# Altium PCB OFP_VIM_v1.5.2.PcbDoc (part 1 of 3)
Units mil, origin at the board's own origin, x right, y up, seen from the top; angles counter-clockwise.
Board outline 4311.02 x 2539.37 mil, 2 copper layers (Top Layer, Bottom Layer), stack 62.256 mil thick; 96 components, 59 nets, 240 pads, 33 vias.
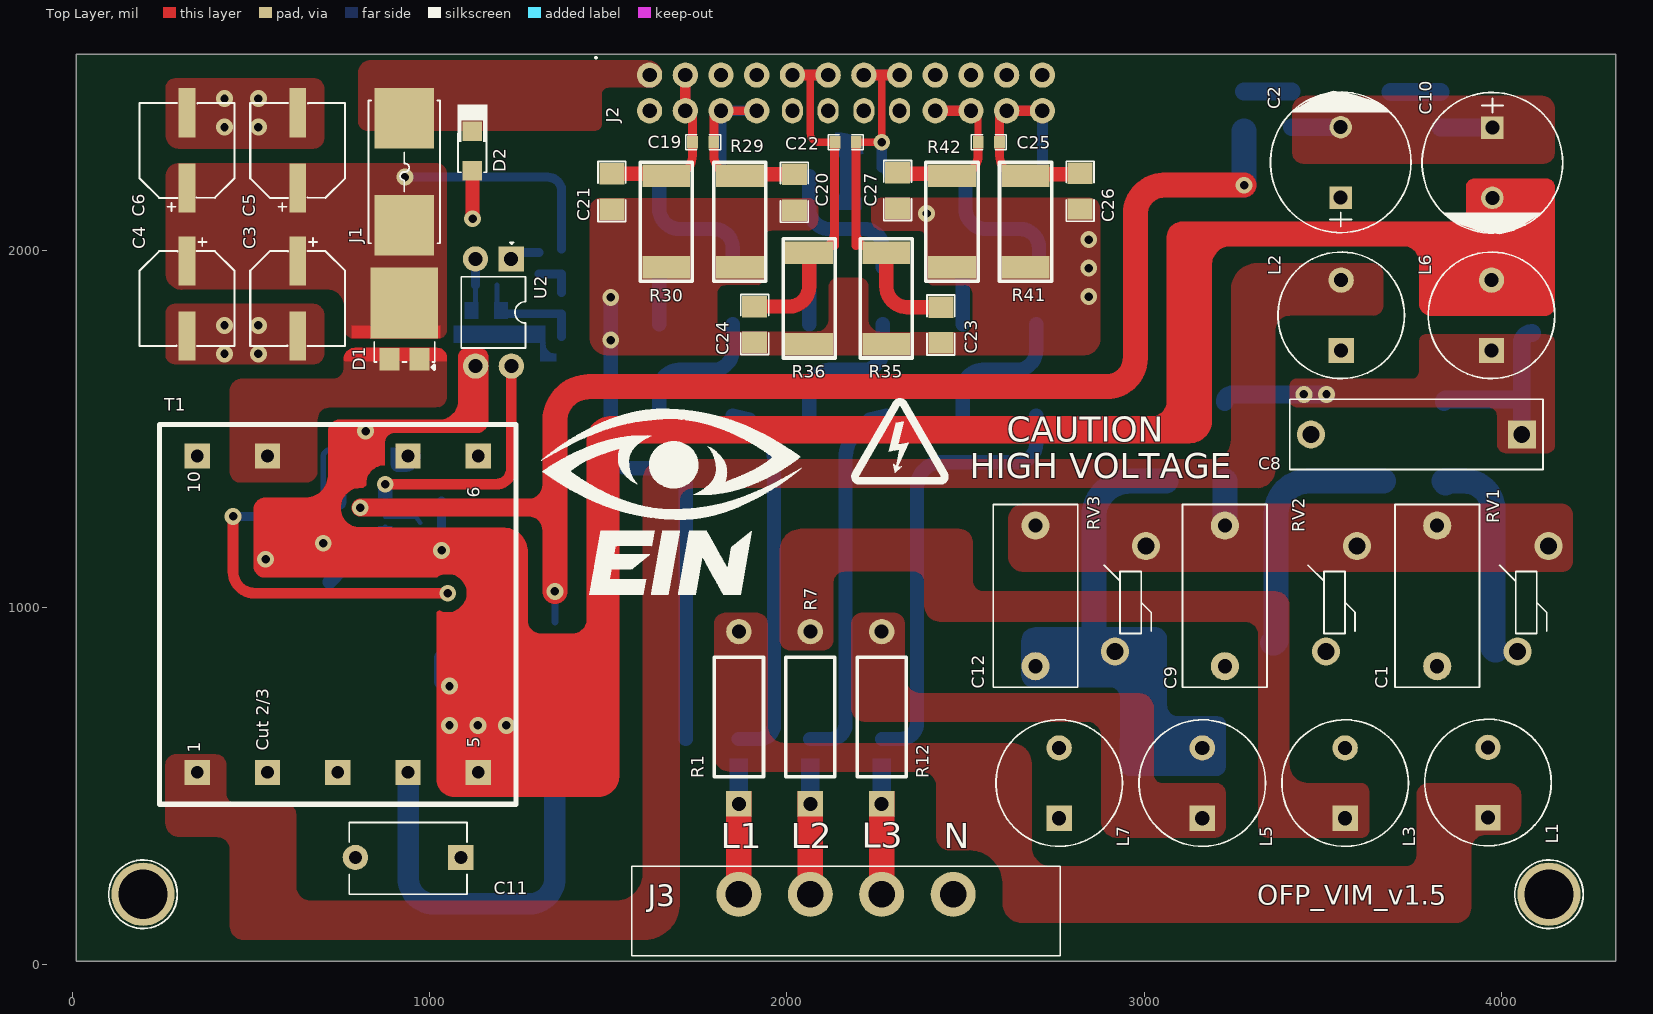
[diagram p0: Top Layer view]
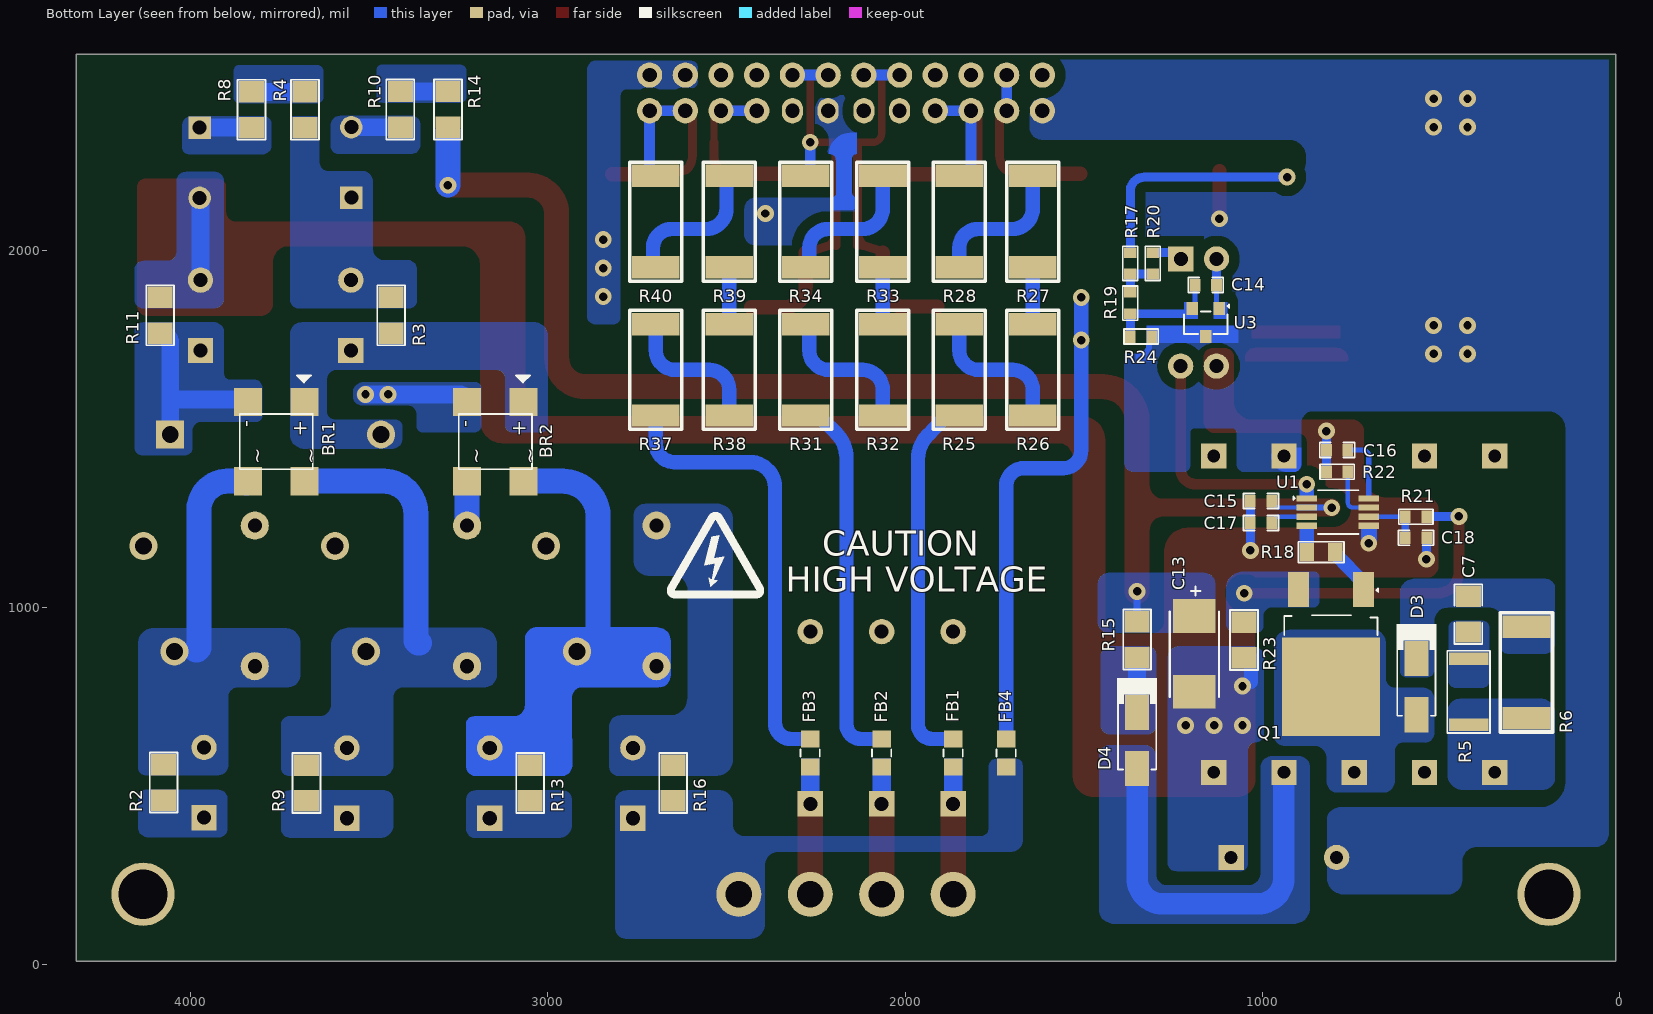
[diagram p1: Bottom Layer view, seen from below]
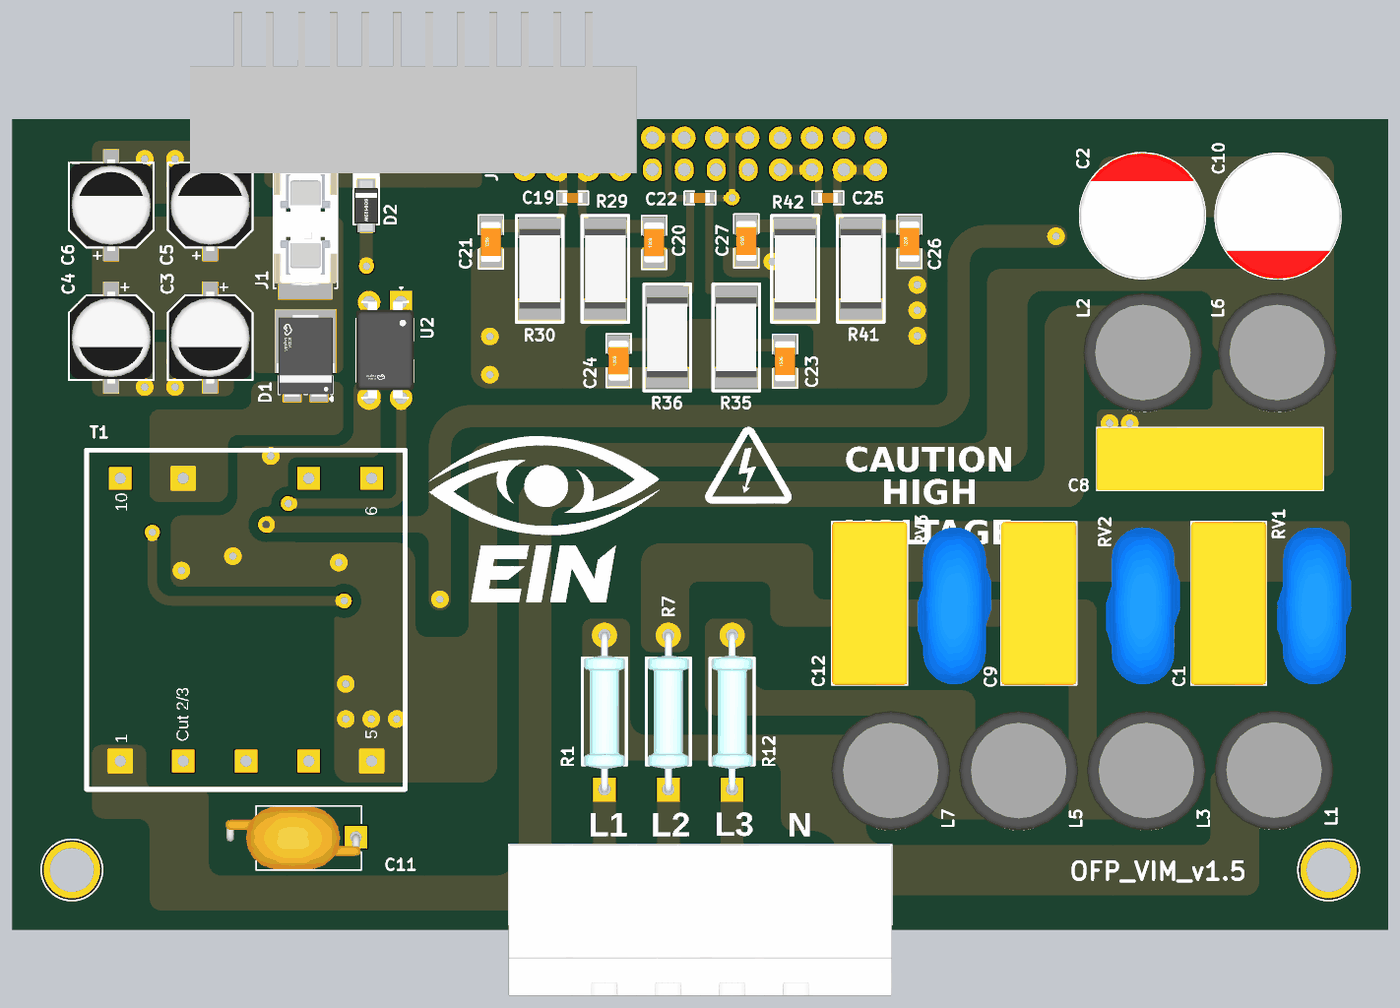
[diagram p3: 3D render of the assembled board from above, using the file's embedded part models]
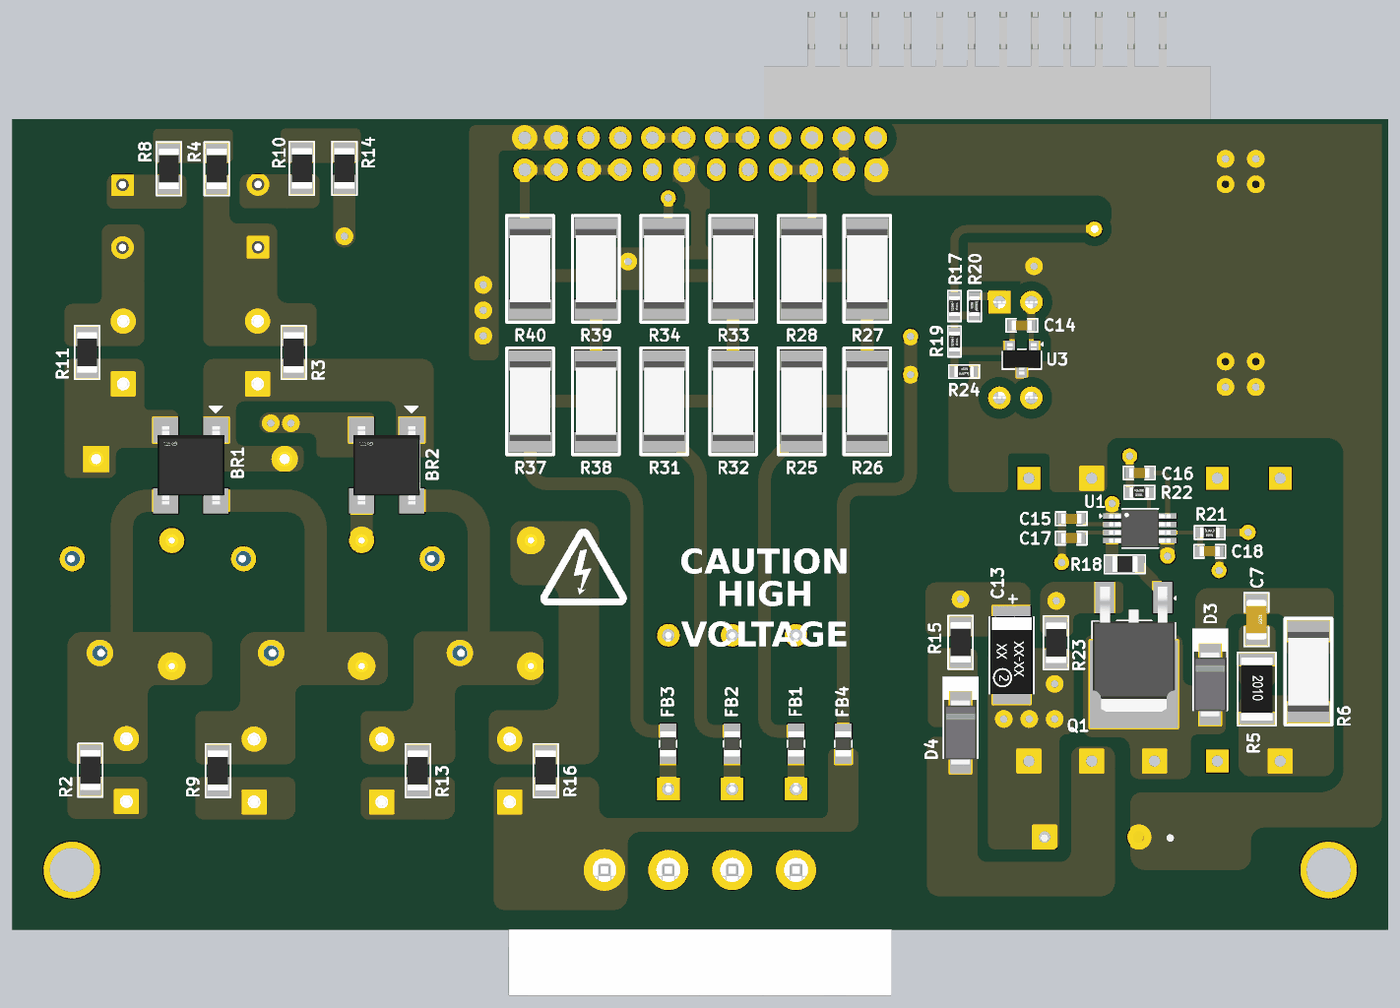
[diagram p4: 3D render of the assembled board from below, using the file's embedded part models]

## Layer stack, top to bottom
Top Solder: solder mask 0.4, Solder Resist, Dk 3.5
Top Layer: signal copper 1.378
Dielectric 1: dielectric 59.5, FR-4, Dk 4.8
Bottom Layer: signal copper 1.378
Bottom Solder: solder mask 0.4, Solder Resist, Dk 3.5

## Board outline
9.84,9.84 9.84,2549.21 4320.87,2549.21 4320.87,9.84

## Design rules (kind name [scope] priority, off if disabled: settings)
BoardOutlineClearance [All] p1: gap=0 ignorepadtopadclearanceinfootprint=FALSE except(15: Poly-OutlineEdge)
Clearance [All] p1: gap=10 ignorepadtopadclearanceinfootprint=FALSE except(7: SMDPad-SMDPad SMDPad-Fill; 20: Arc-Region Track-Region SMDPad-Region THPad-Region Via-Region Fill-Region Poly-Region Region-Region; 30: Arc-Poly Track-Poly SMDPad-Poly THPad-Poly Via-Poly Fill-Poly Poly-Poly)
ComponentClearance [All] p1: gap=0 collisioncheckmode=3 verticalgap=0 showdistances=FALSE
HoleSize [All] p1: absolutevalues=TRUE maxlimit=1000 minlimit=1 maxpercent=80.000 minpercent=20.000
HoleToHoleClearance [All] p1: gap=0 allowstackedmicrovias=TRUE
MinimumSolderMaskSliver [All] p1: minsoldermaskwidth=0
PolygonConnect [All] p1: connectstyle=Direct reliefconductorwidth=10 reliefentries=4 polygonreliefangle="90 Angle" airgapwidth=10
RoutingVias [All] p1: holewidth=11.81 width=23.62 viastyle="Through Hole" minholewidth=23.62 minwidth=47.24 maxholewidth=23.62 maxwidth=47.24
SilkToSilkClearance [All] p1: silktosilkclearance=0
SilkToSolderMaskClearance [IsPad] p1: minsilkscreentomaskgap=0 clearancetoexposedcopper=TRUE
SolderMaskExpansion [All] p1: expansion=4 istentingtop=FALSE
SupplyNets "Schematic Supply Nets_44" [InNet('VIN+')] p1: voltage=0.000
SupplyNets "Schematic Supply Nets_43" [InNet('GND')] p2: voltage=0.000
SupplyNets "Schematic Supply Nets_42" [InNet('12V')] p3: voltage=0.000
SupplyNets "Schematic Supply Nets_41" [InNet('PGND')] p4: voltage=0.000
SupplyNets "Schematic Supply Nets_33" [InNet('VA_P')] p5: voltage=0.000
SupplyNets "Schematic Supply Nets_29" [InNet('VB_P')] p6: voltage=0.000
SupplyNets "Schematic Supply Nets_24" [InNet('VB_N')] p7: voltage=0.000
SupplyNets "Schematic Supply Nets_23" [InNet('VC_N')] p8: voltage=0.000
SupplyNets "Schematic Supply Nets_19" [InNet('VC_P')] p9: voltage=0.000
SupplyNets "Schematic Supply Nets_7" [InNet('VA_N')] p10: voltage=0.000
SupplyNets "Schematic Supply Nets_4" [InNet('NGND')] p11: voltage=0.000
Width [All] p1: maxlimit=100 minlimit=8 preferedwidth=15 minimp=50.000000 maximp=50.000000 favimp=50.000000
24 further rules are at their usual default settings.

## Classes and differential pairs
component class Power-Supply-Sheet: BR1 BR2 C1 C2 C3 C4 C5 C6 C7 C8 C9 C10 C11 C12 C13 C14 C15 C16 C17 C18 D1 D2 D3 D4 F1 J1 L1 L2 L3 L5 L6 L7 Q1 R1 R2 R3 R4 R6 R7 R8 R9 R10 R11 R12 R13 R14 R15 R16 R17 R18 R19 R20 R21 R22 R23 R24 RV1 RV2 RV3 T1 U1 U2 U3
component class INPUT-Connectors-Sheet: C19 C20 C21 C22 C23 C24 C25 C26 C27 FB1 FB2 FB3 FB4 J2 J3 R25 R26 R27 R28 R29 R30 R31 R32 R33 R34 R35 R36 R37 R38 R39 R40 R41 R42

## Components (designator, comment, footprint, x,y, rotation, side; value= is the part's Value field where it differs from the comment)
BR1 "LMB8S-TP" LMBS-1 3760.83,1464.41 r270 bottom
BR2 "LMB8S-TP" LMBS-1 3147.39,1464.41 r270 bottom
C1 "0.1uF" B32921C3104M000 3820.83,1032.34 r270 top locked value=100nF
C2 "33uF" 87EC0494 3550.66,2246.42 r90 top
C3 "68uF" EEEFK1E680P 630,1865 r270 top
C4 "68uF" EEEFK1E680P 320,1865 r270 top
C5 "68uF" EEEFK1E680P 630,2280 r90 top
C6 "68uF" EEEFK1E680P 320,2280 r90 top
C7 "1nF" Cap-1206 422.76,981.35 r270 bottom
C8 "10nF" KP103J1000VP15 3762.5,1484.41 r180 top
C9 "0.1uF" B32921C3104M000 3226.13,1032.34 r270 top locked value=100nF
C10 "33uF" 87EC0494 3975.34,2245.42 r270 top
C11 "1nF" VY2102M29Y5US6TV7 939.07,300 r180 top
C12 "0.1uF" B32921C3104M000 2695.95,1032.34 r270 top locked value=100nF
C13 "10uF" Case-C 1190,870 r270 bottom
C14 "0.01uF" Cap-0603 1158,1902.97 r180 bottom
C15 "1uF" Cap-0603 1003,1297.8 r180 bottom
C16 "220nF" Cap-0603 790,1440.94 r180 bottom
C17 "1uF" Cap-0603 1003.01,1236.61 r180 bottom
C18 "220pF" Cap-0603 569.35,1195 r0 bottom
C19 "51pF" Cap-0603 1765.35,2302.65 r180 top
C20 "22nF" Cap-1206 2020.86,2162.88 r90 top
C21 "22nF" Cap-1206 1509.77,2164.78 r90 top
C22 "51pF" Cap-0603 2164.36,2302.64 r180 top
C23 "22nF" Cap-1206 2430.83,1790.85 r90 top
C24 "22nF" Cap-1206 1909.8,1792.69 r90 top
C25 "51pF" Cap-0603 2565.35,2302.65 r180 top
C26 "22nF" Cap-1206 2820.86,2165.83 r90 top
C27 "22nF" Cap-1206 2309.8,2167.7 r90 top
D1 "FSV20150V" TO-277A 929,1774 r270 top
D2 "15V" SOD-123W 1119,2278 r90 top
D3 "US1K-13-F" SMA 568,778.23 r270 bottom
D4 "ES1C-13-F" SMA 1350,627.74 r270 bottom value=10pF
FB1 "BLM21BD152SN1D" Ind-0805 1865.35,592.37 r90 bottom
FB2 "BLM21BD152SN1D" Ind-0805 2065.35,592.37 r90 bottom
FB3 "BLM21BD152SN1D" Ind-0805 2266,592.37 r90 bottom
FB4 "BLM21BD152SN1D" Ind-0805 1717,592.37 r90 bottom
J1 "01550900M" 01550900M 928.4,2219.76 r90 top
J2 "SFH11-PBPC-D12-RA-BK" SFH11-PBPC-D12-RA-BK 2165.35,2440.95 r180 top locked
J3 "DB2ERM-5.08-4P-GN" DB2ERM-5.08-4P-GN 2165.35,196.85 r0 top locked
L1 "470uH" PK0810-471MB 3963,509.86 r90 top
L2 "470uH" PK0810-471MB 3552,1818.14 r90 top
L3 "470uH" PK0810-471MB 3563,508.29 r90 top locked
L5 "470uH" PK0810-471MB 3163,508.29 r90 top locked
L6 "470uH" PK0810-471MB 3973,1818.14 r90 top
L7 "470uH" PK0810-471MB 2762.35,508.29 r90 top locked
Q1 "IPD90R1K2C3" TO-252-2L 807.19,914.33 r0 bottom
R1 "1R" FMP200JR-52-1R 1865.35,691.14 r90 top
R2 "10K" Res-1206 4076,509.86 r90 bottom value=10kR
R3 "10K" Res-1206 3439,1818.14 r90 bottom value=10kR
R4 "976K" Res-1206 3680.09,2393.85 r270 bottom value=976kR
R5 "100R" RES-2010 421.71,763.78 r270 bottom
R6 "47K" RES-2512 260,818.07 r270 bottom value=47kR
R7 "1R" FMP200JR-52-1R 2065.35,691.14 r90 top
R8 "976K" Res-1206 3830,2393.85 r90 bottom value=976kR
R9 "10K" Res-1206 3676,508.28 r90 bottom value=10kR
R10 "976K" Res-1206 3413.49,2394.85 r270 bottom value=976kR
R11 "10K" Res-1206 4086,1818.14 r90 bottom value=10kR
R12 "1R" FMP200JR-52-1R 2265.35,691.14 r90 top
R13 "10K" Res-1206 3050,508.28 r90 bottom value=10kR
R14 "976K" Res-1206 3280,2394.85 r90 bottom value=976kR
R15 "10R" Res-1206 1350,910 r270 bottom
R16 "10K" Res-1206 2649.35,508.28 r90 bottom value=10kR
R17 "49.9R" Res-0603 1369.13,1963.69 r90 bottom
R18 "0R" Res-0805 835,1155 r180 bottom
R19 "100K" Res-0603 1369.13,1852.61 r90 bottom value=100kR
R20 "4.99K" Res-0603 1306.13,1963.7 r270 bottom value=4.99kR
R21 "1K" Res-0603 569.35,1254.2 r180 bottom
R22 "66.5K" Res-0603 790,1380 r180 bottom
R23 "750mR" Res-1206 1051,909.06 r90 bottom
R24 "26.1K" Res-0603 1339.13,1758.54 r0 bottom
R25 "200K" RES-2512 1848.16,1665.54 r90 bottom
R26 "200K" RES-2512 1642.16,1665.54 r90 bottom
R27 "200K" RES-2512 1642.16,2080.54 r90 bottom
R28 "200K" RES-2512 1848.16,2080.54 r90 bottom
R29 "1K" RES-2512 1868.16,2080.54 r90 top value=1kR
R30 "1K" RES-2512 1662.16,2080.54 r90 top value=1kR
R31 "200K" RES-2512 2278.16,1665.54 r90 bottom
R32 "200K" RES-2512 2062.16,1665.54 r90 bottom
R33 "200K" RES-2512 2062.16,2080.54 r90 bottom
R34 "200K" RES-2512 2278.16,2080.54 r90 bottom
R35 "1K" RES-2512 2278.16,1865.54 r90 top value=1kR
R36 "1K" RES-2512 2062.16,1865.53 r90 top value=1kR
R37 "200K" RES-2512 2698.16,1665.54 r90 bottom
R38 "200K" RES-2512 2492.16,1665.54 r90 bottom
R39 "200K" RES-2512 2492.16,2080.54 r90 bottom
R40 "200K" RES-2512 2698.16,2080.54 r90 bottom
R41 "1K" RES-2512 2668.16,2080.54 r90 top value=1kR
R42 "1K" RES-2512 2462.16,2080.55 r90 top value=1kR
RV1 "471KD10J" 471KD10J 4089.33,1024.44 r270 top locked
RV2 "471KD10J" 471KD10J 3552.73,1024.44 r270 top locked
RV3 "471KD10J" 471KD10J 2961.72,1024.44 r270 top locked
T1 "FTEFD25-037" FTEFD25-037 742.22,981.09 r90 top locked
U1 "LM5021MM-1/NOPB" "8-VSSOP (Pitch 0.65mm)(5x3.1mm)" 788,1267 r180 bottom
U2 "FOD817A" DIP-4 1178,1826 r270 top
U3 "ATL431AIDBZR" SOT-23 1158,1797.91 r0 bottom

## Footprints (in the part's own frame and the unit in brackets; to place one, negate y for a bottom-side part, rotate by r counter-clockwise, add the part's x,y. Pads: shape width x height; smd on the part's side, far side on the other; paste and mask are expansions set on the pad)
"8-VSSOP (Pitch 0.65mm)(5x3.1mm)" [mm]
  rect 1.45x0.45 smd mask+0.05: 1(-2.2,0.975) 2(-2.2,0.325) 3(-2.2,-0.325) 4(-2.2,-0.975) 5(2.2,-0.975) 6(2.2,-0.325) 7(2.2,0.325) 8(2.2,0.975)
  silkscreen extent -3.17,-1.55 1.47,1.55, body extent -2.45,-1.5 2.45,1.5, height 1.1
87EC0494 [mm]
  rect 1.6x1.6 hole 1: 1(-2.5,0)
  round 1.6 hole 1: 2(2.5,0)
  silkscreen extent -5,-5 5.08,5, body extent -5,-5 5,5, height 13
471KD10J [mm]
  round 2 hole 1.2 paste-2539.97 mask+0.051: 1(-3.749,1.1) 2(3.749,-1.1)
  body extent -6.25,-2.95 6.25,2.95, height 13.75
01550900M [mm]
  rect 4.3x4.24 smd paste+0 mask+0.051: 1(-3.8,0) 2(3.8,0)
  silkscreen extent -5.08,-2.54 5.08,2.54, body extent -4.86,-2.52 4.87,2.52, height 3.81
B32921C3104M000 [mm]
  round 2 hole 1: 1(-5,0) 2(5,0)
  silkscreen extent -6.5,-3 6.5,3, body extent -6.5,-3 6.5,3, height 12
Cap-0603 [mil]
  rect 30x35 smd mask+2.36: 1(-30,0) 2(30,0)
  silkscreen extent -49,-21 49,21, body extent -32,-16 31,16, height 34
Cap-1206 [mil] "SMD 1206"
  rect 60x70 smd: 1(-50,0) 2(50,0)
  silkscreen extent -84,-39 84,39, body extent -63,-31 63,32, height 39
Case-C [mm]
  rect 2.4x3 smd: 1(-2.7,0) 2(2.7,0)
  silkscreen extent -4.8,-1.75 3.05,1.75, body extent -3.1,-1.67 3.1,1.68, height 2.46
DB2ERM-5.08-4P-GN [mm]
  round 3.2 hole 1.9 paste-2539.97 mask+0.051: 1(-7.62,0) 2(-2.54,0) 3(2.54,0) 4(7.62,0)
  silkscreen extent -15.24,-4.37 15.24,2, body extent -15.24,-10 15.24,2, height 8.5
DIP-4 [mm]
  rect 1.8x1.8 hole 1 paste-2539.97 mask+0.051: 1(-3.81,1.265)
  round 1.8 hole 1 copper offset 0,0 paste-2539.97 mask+0.051: 2(-3.81,-1.275) 3(3.81,-1.265) 4(3.81,1.275)
  silkscreen extent -4.98,-2.28 2.53,2.29, body extent -3.91,-2.3 3.91,2.3, height 4.29
EEEFK1E680P [mm]
  rect 3.5x1.2 smd paste+0 mask+0.051: 1(-2.67,0) 2(2.67,0)
  silkscreen extent -4.31,-3.38 3.38,3.38, body extent -3.65,-3.3 3.65,3.3, height 5.8
FMP200JR-52-1R [mm]
  rect 1.8x1.8 hole 1: 1(-6.125,0)
  round 1.8 hole 1: 2(6.125,0)
  silkscreen extent -4.19,-1.75 4.32,1.75, body extent -6.4,-1.65 6.4,1.65, height 3.29
FTEFD25-037 [mm]
  rect 1.8x1.8 hole 0.9: 1(-11.25,10) 2(-11.25,5) 3(-11.25,0) 4(-11.25,-5) 5(-11.25,-10) 6(11.25,-10) 7(11.25,-5) 9(11.25,5) 10(11.25,10)
Ind-0805 [mm] "Inductor 0805"
  rect 1.2x1.32 smd: 1(-1,0) 2(1,0)
  silkscreen extent -0.25,-0.69 0.25,0.69, body extent -1,-0.62 1,0.63, height 0.47
KP103J1000VP15 [mm]
  rect 2x2 hole 1.2 paste-2539.97 mask+0.05: 1(-7.5,0)
  round 2 hole 1.2 paste-2539.97 mask+0.05: 2(7.5,0)
  silkscreen extent -9,-2.5 9,2.5, body extent -9,-2.5 9,2.5, height 11
LMBS-1 [mm]
  rect 2x2 smd: 1(-2.817,2) 2(2.817,2) 3(2.817,-2) 4(-2.817,-2)
  silkscreen extent -1.97,-2.6 1.97,2.6, body extent -3.1,-2.65 3.1,2.65, height 1.6
PK0810-471MB [mm]
  rect 1.8x1.8 hole 1: 1(-2.5,0)
  round 1.8 hole 1: 2(2.5,0)
  silkscreen extent -4.5,-4.5 4.5,4.5, body extent -4.76,-4.75 4.74,4.75, height 12.3
Res-0603 [mil]
  rect 30x35 smd: 1(-30,0) 2(30,0)
  silkscreen extent -48,-21 48,21, body extent -31,-17 31,17, height 18
Res-0805 [mil] "SMD 0805"
  rect 40x50 smd: 1(-40,0) 2(40,0)
  silkscreen extent -64,-29 64,29, body extent -39,-25 39,24, height 24
Res-1206 [mil]
  rect 60x70 smd: 1(-50,0) 2(50,0)
  silkscreen extent -84,-39 84,39, body extent -63,-31 63,31, height 24
RES-2010 [mm]
  rect 0.9x2.8 smd: 1(-2.35,0) 2(2.35,0)
  silkscreen extent -2.92,-1.52 2.92,1.52, body extent -2.5,-1.25 2.5,1.25, height 0.6
RES-2512 [mm]
  rect 1.6x3.4 smd: 1(-3.25,0) 2(3.25,0)
  silkscreen extent -4.24,-1.85 4.24,1.85, body extent -3.17,-1.63 3.18,1.63, height 0.58
SFH11-PBPC-D12-RA-BK [mm]
  round 1.8 hole 1.02: 1(-13.97,-1.27) 2(-13.97,1.27) 3(-11.43,-1.27) 4(-11.43,1.27) 5(-8.89,-1.27) 6(-8.89,1.27) 7(-6.35,-1.27) 8(-6.35,1.27) 9(-3.81,-1.27) 11(-1.27,-1.27) 13(1.27,-1.27) 15(3.81,-1.27) 17(6.35,-1.27) 18(6.35,1.27) 19(8.89,-1.27) 20(8.89,1.27) 21(11.43,-1.27) 22(11.43,1.27) 23(13.97,-1.27) 24(13.97,1.27)
  oval 1.5x1.8 hole 1.02: 10(-3.81,1.27) 12(-1.27,1.27) 14(1.27,1.27) 16(3.81,1.27)
  silkscreen extent 17.78,-2.51 17.79,-2.5, body extent -17.78,-11.29 17.78,1.55, height 7.05
SMA [mm]
  rect 2.5x1.7 smd: 1(-2,0) 2(2,0)
  silkscreen extent -4.45,-1.42 2.06,1.42, body extent -2.6,-1.3 2.6,1.3, height 2.4
SOD-123W [mm] "DIODE SCHOTTKY 30V 1A SOD123W"
  rect 1.4x1.4 smd: 1(-1.4,0) 2(1.4,0)
  silkscreen extent -1.5,-1.07 3.3,1.07, body extent -2,-0.95 2,0.95, height 1.1
SOT-23 [mm] "TRANS NPN 40V 0.6A SOT23"
  rect 0.82x0.92 smd: 1(-0.95,-1) 2(0.95,-1) 3(0,1)
  silkscreen extent -1.68,-1.3 1.55,0.81, body extent -1.5,-1.25 1.5,1.25, height 1.05
TO-252-2L [mm]
  rect 1.5x2.5 smd: 1(-2.3,-3.45) 3(2.3,-3.45)
  rect 7x7 smd: 2(0,3.45)
  silkscreen extent -3.35,-3.53 3.33,-0.2, body extent -3.27,-4.31 3.27,5.63, height 2.34
TO-277A [mm]
  rect 1.6x1.4 smd paste+0 mask+0.05: 1(2,1.065) 2(2,-1.065)
  rect 5.05x4.8 smd paste+0 mask+0.05: 3(-2,0)
  silkscreen extent 0.76,-2.15 2.7,2.15, body extent -4.1,-2.3 2.4,2.3, height 1.12
VY2102M29Y5US6TV7 [mm]
  rect 1.8x1.8 hole 0.92: 1(-3.75,0)
  round 1.8 hole 0.92: 2(3.75,0)
  silkscreen extent -4.19,-2.49 4.19,2.62, body extent -4.15,-2.43 6.65,2.57, height 11.75

## Part data
BR1 BR2: "30A 950mV@400mA 1A 800V LMBS-1 Bridge Rectifiers ROHS", LCSC Part Number=C435904, Manufacturer="MCC(Micro Commercial Components)", Package=LMBS-1, ComponentLink1Description=LCSC, ComponentLink1URL=https://www.lcsc.com/product-detail/Bridge-Rectifiers_MCC-Micro-Commercial-Components-LMB8S-TP_C435904.html?s_z=n_MB8S-TP, Item Type=Bridge, Manufacturer Part Number=LMB8S-TP
C1 C9 C12: library part B32921C3104M000, "CAP FILM 0.1UF 20% 630VDC RADIAL", Case/Package=Radial, Dielectric=PP, Dielectric Material=Polypropylene, Insulation Resistance=100R, LCSC Part Number=C361368, Manufacturer="TDK EPCOS", Max Operating Temperature=110°C, Min Operating Temperature=-40°C, Ratings=X2, Tolerance=20%, Voltage=630V, Voltage Rating (AC)=305V, ComponentLink1Description=https://datasheet.ciiva.com/48779/1833206-48779695.pdf?src-supplier=Element14, ComponentLink1URL=https://datasheet.ciiva.com/48779/1833206-48779695.pdf?src-supplier=Element14, Depth=6mm, Dissipation Factor=1%, Height=12mm, Item Type="Film Capacitors", Lead Diameter=0.6mm, Lead Length=6mm, Lead Pitch=10mm, Length=13mm, Manufacturer Part Number=B32921C3104M000, Mounting Technology="Through Hole", Pins=2NUMBER, Pricing="100=1.997, 250=1.855, 500=1.75, 1000=1.571 (DKK)", Reach SVHC Compliant=No, RoHS=Yes, RoHS Compliant=Yes, Series=B32921, Stock=6670, Supplier=Rs, Termination="PC Pins", Voltage Rating (DC)=630V
C2 C10: library part 87EC0494, "33uF 420V 1Ω@100kHz 430mA@100kHz ±20% Plugin,D10xL16mm Aluminum Electrolytic Capacitors - Leaded ROHS", LCSC Part Number=C6718366, Manufacturer=KNSCHA, Package=Plugin,D10xL16mm, ComponentLink1Description=LCSC, ComponentLink1URL=https://www.lcsc.com/product-detail/Aluminum-Electrolytic-Capacitors-Leaded_KNSCHA-87EC0494_C6718366.html, Item Type=Capacitor, Manufacturer Part Number=87EC0494
C3 C4 C5 C6: library part EEE-FK1E680P, "CAP ALUM 68UF 20% 25V SMD", Case/Package=Radial, ESR (Equivalent Series Resistance)=360mR, LCSC Part Number=C336242, Leakage Current=3uA, Manufacturer=Panasonic, Max Operating Temperature=105°C, Min Operating Temperature=-55°C, Package Quantity=1000, Ratings=AEC-Q200, Ripple Current=240mA, Tolerance=20%, Voltage=25V, ComponentLink1Description=https://datasheet.ciiva.com/11777/0900766b80e4e8b0-11777398.pdf?src-supplier=Rs, ComponentLink1URL=https://datasheet.ciiva.com/11777/0900766b80e4e8b0-11777398.pdf?src-supplier=Rs, ComponentLink2Description=https://datasheet.ciiva.com/29313/443469-da-01-en-smd-elko-vfk-d-68-uf-25v-29313567.pdf?src-supplier=Conrad, ComponentLink2URL=https://datasheet.ciiva.com/29313/443469-da-01-en-smd-elko-vfk-d-68-uf-25v-29313567.pdf?src-supplier=Conrad, ComponentLink3Description=https://datasheet.ciiva.com/43458/1676921-43458431.pdf?src-supplier=Farnell, ComponentLink3URL=https://datasheet.ciiva.com/43458/1676921-43458431.pdf?src-supplier=Farnell, ComponentLink4Description=https://datasheet.ciiva.com/6059/1676921-6059990.pdf?src-supplier=Farnell, ComponentLink4URL=https://datasheet.ciiva.com/6059/1676921-6059990.pdf?src-supplier=Farnell, ComponentLink5Description=https://datasheet.ciiva.com/46376/1676921-46376456.pdf?src-supplier=Element14, ComponentLink5URL=https://datasheet.ciiva.com/46376/1676921-46376456.pdf?src-supplier=Element14, ComponentLink6Description=https://datasheet.ciiva.com/28678/731857-28678902.pdf?src-supplier=Element14, ComponentLink6URL=https://datasheet.ciiva.com/28678/731857-28678902.pdf?src-supplier=Element14, ComponentLink7Description=https://datasheet.ciiva.com/24025/aba0000ce120-24025195.pdf?src-supplier=Mouser, ComponentLink7URL=https://datasheet.ciiva.com/24025/aba0000ce120-24025195.pdf?src-supplier=Mouser, ComponentLink8Description=https://datasheet.ciiva.com/14606/70258115-14606377.pdf?src-supplier=Allied+Electronics, ComponentLink8URL=https://datasheet.ciiva.com/14606/70258115-14606377.pdf?src-supplier=Allied+Electronics, ComponentLink9Description=https://datasheet.ciiva.com/14602/70258115-14602777.pdf?src-supplier=Allied+Electronics, ComponentLink9URL=https://datasheet.ciiva.com/14602/70258115-14602777.pdf?src-supplier=Allied+Electronics, ComponentLink10Description=https://datasheet.ciiva.com/48524/fk-eng-tds-48524141.pdf?src-supplier=Distrelec, ComponentLink10URL=https://datasheet.ciiva.com/48524/fk-eng-tds-48524141.pdf?src-supplier=Distrelec, ComponentLink11Description=https://datasheet.ciiva.com/46388/1676921-46388422.pdf?src-supplier=Element14, ComponentLink11URL=https://datasheet.ciiva.com/46388/1676921-46388422.pdf?src-supplier=Element14, ComponentLink12Description=https://datasheet.ciiva.com/16201/aba0000ce120-16201529.pdf?src-supplier=Future+Electronics, ComponentLink12URL=https://datasheet.ciiva.com/16201/aba0000ce120-16201529.pdf?src-supplier=Future+Electronics, ComponentLink13Description=https://datasheet.ciiva.com/15166/getdatasheetpartid-169293-15166167.pdf?src-supplier=Verical, ComponentLink13URL=https://datasheet.ciiva.com/15166/getdatasheetpartid-169293-15166167.pdf?src-supplier=Verical, ComponentLink14Description=https://datasheet.ciiva.com/2985/aba0000ce120-2985437.pdf?src-supplier=Avnet, ComponentLink14URL=https://datasheet.ciiva.com/2985/aba0000ce120-2985437.pdf?src-supplier=Avnet, ComponentLink15Description=https://datasheet.ciiva.com/30173/aba0000ce120-30173071.pdf?src-supplier=Onlinecomponents.com, ComponentLink15URL=https://datasheet.ciiva.com/30173/aba0000ce120-30173071.pdf?src-supplier=Onlinecomponents.com, Construction=Cylindrical, Diameter=6.3mm, Height=5.8mm, Impedance=360mR, Item Type=Capacitor, Lead Diameter=0.65mm, Lead Free="Lead Free", Lead Pitch=1.8mm, Length=5.8mm, Life (Hours)=2000Hour, Manufacturer Part Number=EEE-FK1E680P, Material=Aluminium, Mounting Technology="Surface Mount,PCB", Packaging="Tape and Reel", Pins=2, Pricing="1=0.44, 10=0.209, 50=0.209, 100=0.15, 1000=0.12, 10000=0.1 (USD)", Radiation Hardening=No, Reach SVHC Compliant=No, Ripple Current (AC)=240mA, RoHS=Yes, RoHS Compliant=Yes, Series=FK, Stock=7162, Supplier=Mouser, Termination=SMD/SMT, Voltage Rating=25V, Voltage Rating (DC)=25V, Width=7.8mm
C7: library part GRM31BR73A102KW01L, "CAP CER 1000PF 1KV X7R 1206", LCSC Part Number=C97941, Manufacturer=Murata, ComponentLink1Description=https://datasheet.ciiva.com/138/partnumbering-e-01-138541.pdf?src-supplier=Digikey, ComponentLink1URL=https://datasheet.ciiva.com/138/partnumbering-e-01-138541.pdf?src-supplier=Digikey, ComponentLink2Description=https://datasheet.ciiva.com/138/partnumbering-e-01-138542.pdf?src-supplier=Digikey, ComponentLink2URL=https://datasheet.ciiva.com/138/partnumbering-e-01-138542.pdf?src-supplier=Digikey, ComponentLink3Description=https://datasheet.ciiva.com/138/partnumbering-e-01-138543.pdf?src-supplier=Digikey, ComponentLink3URL=https://datasheet.ciiva.com/138/partnumbering-e-01-138543.pdf?src-supplier=Digikey, ComponentLink4Description=https://datasheet.ciiva.com/5421/c02e-5421641.pdf?src-supplier=Mouser, ComponentLink4URL=https://datasheet.ciiva.com/5421/c02e-5421641.pdf?src-supplier=Mouser, ComponentLink5Description=https://datasheet.ciiva.com/48512/grm31br73a102kw01l-eng-tds-48512268.pdf?src-supplier=Distrelec, ComponentLink5URL=https://datasheet.ciiva.com/48512/grm31br73a102kw01l-eng-tds-48512268.pdf?src-supplier=Distrelec, Item Type=Capacitors, Lead Free=5697LeadFree, Manufacturer Part Number=GRM31BR73A102KW01L, Pricing="1=0.74, 10=0.361, 50=0.361, 100=0.309, 1000=0.219, 10000=0.169 (USD)", RoHS=Yes, Stock=17487, Supplier=Mouser
C8: library part KP103J1000VP15, "10nF -40℃~+105℃ ±5% 1kV Plugin,P=15mm Polypropylene Film Capacitors (CBB) ROHS", LCSC Part Number=C390160, Manufacturer=KYET, Package=Plugin,P=15mm, ComponentLink1Description=LCSC, ComponentLink1URL=https://www.lcsc.com/product-detail/Polypropylene-Film-Capacitors-CBB_KYET-KP103J1000VP15_C390160.html, Item Type=Capacitor, Manufacturer Part Number=KP103J1000VP15
C11: library part VY2102M29Y5US6TV7, "CAP CER 1000PF 440VAC Y5U RADIAL", LCSC Part Number=C511063, Manufacturer="Vishay BCcomponents", Voltage Rating=1kV, ComponentLink1Description=https://datasheet.ciiva.com/11789/0900766b80fa7d12-11789611.pdf?src-supplier=Rs, ComponentLink1URL=https://datasheet.ciiva.com/11789/0900766b80fa7d12-11789611.pdf?src-supplier=Rs, ComponentLink2Description=https://datasheet.ciiva.com/15164/getdatasheetpartid-169624-15164808.pdf?src-supplier=Verical, ComponentLink2URL=https://datasheet.ciiva.com/15164/getdatasheetpartid-169624-15164808.pdf?src-supplier=Verical, ComponentLink3Description=https://datasheet.ciiva.com/184/vy2series-184358.pdf?src-supplier=Digikey, ComponentLink3URL=https://datasheet.ciiva.com/184/vy2series-184358.pdf?src-supplier=Digikey, Item Type=Capacitors, Manufacturer Part Number=VY2102M29Y5US6TV7, Material=4241ConductorMaterial, Pricing="1=0.33, 10=0.2, 50=0.2, 100=0.129, 1000=0.082, 10000=0.07 (USD)", RoHS=Yes, RoHS Compliant=5897YesNo, Stock=17875, Supplier=Mouser
C13: library part TAJC106K035RNJ, "CAP TANT 10UF 10% 35V 2312", Case Code (Imperial)=2312, Case Code (Metric)=6032, Case/Package=Molded, Dielectric Material=Tantalum, ESR (Equivalent Series Resistance)=1.6R, LCSC Part Number=C7211, Leakage Current=3.5uA, Manufacturer="Kyocera AVX", Max Operating Temperature=125°C, Min Operating Temperature=-55°C, Package Quantity=500, Ripple Current=262mA, Tolerance=20%, Voltage=25V, Voltage Rating=35V, ComponentLink1Description=https://datasheet.ciiva.com/11793/0900766b80ccdc61-11793205.pdf?src-supplier=Rs, ComponentLink1URL=https://datasheet.ciiva.com/11793/0900766b80ccdc61-11793205.pdf?src-supplier=Rs, ComponentLink2Description=https://datasheet.ciiva.com/26341/559442-da-01-en-tacc-c-6-0-mm-x-3-2-mm-x-2-6-mm-10-uf-26341782.pdf?src-supplier=Conrad, ComponentLink2URL=https://datasheet.ciiva.com/26341/559442-da-01-en-tacc-c-6-0-mm-x-3-2-mm-x-2-6-mm-10-uf-26341782.pdf?src-supplier=Conrad, ComponentLink3Description=https://datasheet.ciiva.com/5937/taj-5937099.pdf?src-supplier=Farnell, ComponentLink3URL=https://datasheet.ciiva.com/5937/taj-5937099.pdf?src-supplier=Farnell, ComponentLink4Description=https://datasheet.ciiva.com/7730/taj-7730983.pdf?src-supplier=Element14, ComponentLink4URL=https://datasheet.ciiva.com/7730/taj-7730983.pdf?src-supplier=Element14, ComponentLink5Description=https://datasheet.ciiva.com/7730/1703059-7730751.pdf?src-supplier=Element14, ComponentLink5URL=https://datasheet.ciiva.com/7730/1703059-7730751.pdf?src-supplier=Element14, ComponentLink6Description=https://datasheet.ciiva.com/7730/1703059-7730750.pdf?src-supplier=Element14, ComponentLink6URL=https://datasheet.ciiva.com/7730/1703059-7730750.pdf?src-supplier=Element14, ComponentLink7Description=https://datasheet.ciiva.com/7730/1680476-7730748.pdf?src-supplier=Element14, ComponentLink7URL=https://datasheet.ciiva.com/7730/1680476-7730748.pdf?src-supplier=Element14, ComponentLink8Description=https://datasheet.ciiva.com/7730/13070-7730749.pdf?src-supplier=Element14, ComponentLink8URL=https://datasheet.ciiva.com/7730/13070-7730749.pdf?src-supplier=Element14, ComponentLink9Description=https://datasheet.ciiva.com/264/taj-264350.pdf?src-supplier=Digikey, ComponentLink9URL=https://datasheet.ciiva.com/264/taj-264350.pdf?src-supplier=Digikey, ComponentLink10Description=https://datasheet.ciiva.com/264/taj-264349.pdf?src-supplier=Digikey, ComponentLink10URL=https://datasheet.ciiva.com/264/taj-264349.pdf?src-supplier=Digikey, ComponentLink11Description=https://datasheet.ciiva.com/264/taj-264351.pdf?src-supplier=Digikey, ComponentLink11URL=https://datasheet.ciiva.com/264/taj-264351.pdf?src-supplier=Digikey, ComponentLink12Description=https://datasheet.ciiva.com/12911/taj-27497-12911561.pdf?src-supplier=Mouser, ComponentLink12URL=https://datasheet.ciiva.com/12911/taj-27497-12911561.pdf?src-supplier=Mouser, ComponentLink13Description=https://datasheet.ciiva.com/14590/70001050-14590313.pdf?src-supplier=Allied+Electronics, ComponentLink13URL=https://datasheet.ciiva.com/14590/70001050-14590313.pdf?src-supplier=Allied+Electronics, ComponentLink14Description=https://datasheet.ciiva.com/3004/taj-3004476.pdf?src-supplier=Avnet, ComponentLink14URL=https://datasheet.ciiva.com/3004/taj-3004476.pdf?src-supplier=Avnet, ComponentLink15Description=https://datasheet.ciiva.com/15163/getdatasheetpartid-110753-15163367.pdf?src-supplier=Verical, ComponentLink15URL=https://datasheet.ciiva.com/15163/getdatasheetpartid-110753-15163367.pdf?src-supplier=Verical, ComponentLink16Description=https://datasheet.ciiva.com/3004/taj-3004475.pdf?src-supplier=Avnet, ComponentLink16URL=https://datasheet.ciiva.com/3004/taj-3004475.pdf?src-supplier=Avnet, Construction=Flat, Depth=3.2mm, Dissipation Factor=6%, Features="General Purpose", Height=2.6mm, Item Type="Tantalum Capacitors", Lead Free="Lead Free", Length=6mm, Life (Hours)=2000Hour, Manufacturer Part Number=TAJC106K035RNJ, Mounting Technology="Surface Mount,PCB", Packaging="Tape and Reel", Pins=2, Polarity=Polar, Pricing="500=0.4611, 1000=0.4505, 2000=0.4399, 3000=0.4293, 4000=0.4187, 5000=0.4081, 50000=0.4028 (USD)", Radiation Hardening=No, Reach SVHC Compliant=No, RoHS=Yes, RoHS Compliant=Yes, Series=TAJ, Stock=20000, Supplier=Avnet, Supplier Part Number=TAJC106K035RNJ, Termination=SMD/SMT, Voltage Rating (DC)=35V, Width=3.2mm
C14: library part CC0603KRX7R9BB103, "CAP CER 10000PF 50V X7R 0603", Capacitance=10nF, Case Code (Imperial)=0603, Case Code (Metric)=1608, Dielectric=X7R, Insulation Resistance=100GR, LCSC Part Number=C100042, Manufacturer=Yageo, Max Operating Temperature=125°C, Min Operating Temperature=-55°C, Package Quantity=1, Supplier Part Number 1=311-1085-6-ND, Tolerance=10%, Voltage=50V, Case/Package=0603, ComponentLink1Description=http://www.farnell.com/datasheets/1734573.pdf?src-supplier=Element14, ComponentLink1URL=http://www.farnell.com/datasheets/1734573.pdf?src-supplier=Element14, ComponentLink2Description=http://www.yageo.com/documents/recent/UPY-GPHC_X7R_6.3V-to-50V_18.pdf?src-supplier=Digi-Key, ComponentLink2URL=http://www.yageo.com/documents/recent/UPY-GPHC_X7R_6.3V-to-50V_18.pdf?src-supplier=Digi-Key, ComponentLink3Description=http://www.farnell.com/datasheets/2167236.pdf?src-supplier=Mouser, ComponentLink3URL=http://www.farnell.com/datasheets/2167236.pdf?src-supplier=Mouser, ComponentLink4Description=http://www.farnell.com/datasheets/70765.pdf?src-supplier=Element14, ComponentLink4URL=http://www.farnell.com/datasheets/70765.pdf?src-supplier=Element14, ComponentLink5Description=http://www.yageo.com/documents/recent/UPY-GPHC_X7R_6.3V-to-50V_8.pdf?src-supplier=Avnet+Europe, ComponentLink5URL=http://www.yageo.com/documents/recent/UPY-GPHC_X7R_6.3V-to-50V_8.pdf?src-supplier=Avnet+Europe, ComponentLink6Description=http://www.farnell.com/datasheets/1489800.pdf?src-supplier=Element14, ComponentLink6URL=http://www.farnell.com/datasheets/1489800.pdf?src-supplier=Element14, ComponentLink7Description=https://www.verical.com/server-webapp/html/getDatasheet?partID=403582&src-supplier=Verical, ComponentLink7URL=https://www.verical.com/server-webapp/html/getDatasheet?partID=403582&src-supplier=Verical, Composition=Ceramic, Depth=0.8mm, Halogen Free="Halogen Free", Height=0.8mm, Lead Free="Lead Free", Length=1.6mm, Manufacturer Part Number=CC0603KRX7R9BB103, Material=Ceramic, Mount="Surface Mount", Number of Pins=2, Packaging="Tape and Reel", Pricing 1="1=0.1, 10=0.038, 100=0.0171, 500=0.01224, 1000=0.00962 (USD)", Radiation Hardening=No, REACH SVHC="No SVHC", Stock 1=8411467, Supplier 1=Digi-Key, Termination=SMD/SMT, Thickness=0.035inch, Voltage Rating=50V, Voltage Rating (DC)=50V, Width=0.031inch
C15 C17: library part CC0603KRX7R9BB105, "CAP CER 1UF 50V X7R 0603", Case Code (Imperial)=0603, Case Code (Metric)=1608, Dielectric=X7R, LCSC Part Number=C559769, Manufacturer=Yageo, Max Operating Temperature=125°C, Min Operating Temperature=-55°C, Package Quantity=4000, Tolerance=10%, Voltage Rating=50V, Case/Package=0603, ComponentLink1Description=http://www.mouser.com/ds/2/447/Yageo_UPY-GP_NP0_16V-to-50V_9-358835.pdf?src-supplier=Mouser, ComponentLink1URL=http://www.mouser.com/ds/2/447/Yageo_UPY-GP_NP0_16V-to-50V_9-358835.pdf?src-supplier=Mouser, ComponentLink2Description=http://www.yageo.com/documents/recent/UPY-GPHC_X7R_6.3V-to-50V_18.pdf?src-supplier=Digikey, ComponentLink2URL=http://www.yageo.com/documents/recent/UPY-GPHC_X7R_6.3V-to-50V_18.pdf?src-supplier=Digikey, ComponentLink3Description=https://datasheet.octopart.com/CC0603KRX7R9BB105-Yageo-datasheet-137700082.pdf?src-supplier=Future+Electronics, ComponentLink3URL=https://datasheet.octopart.com/CC0603KRX7R9BB105-Yageo-datasheet-137700082.pdf?src-supplier=Future+Electronics, Halogen Free=5694HalogenFree, Height=900um, Item Type=Capacitors, Lead Free="Lead Free", Length=0.063inch, Manufacturer Part Number=CC0603KRX7R9BB105, Material=4241ConductorMaterial, Mounting Technology="Surface Mount", Packaging="Tape and Reel", RoHS=Yes, RoHS Compliant=Yes, Series=CC, Stock=950, Supplier=Rs, Termination=SMD/SMT, Thickness=0.035inch, Voltage Rating (DC)=50V, Weight=7.1E-05oz, Width=0.031inch
C16: library part CC0603KRX7R8BB224, "CAP CER 0.22UF 25V X7R 0603", LCSC Part Number=C106857, Manufacturer=Yageo, ComponentLink1Description=http://www.mouser.com/ds/2/447/Yageo_UPY-GP_NP0_16V-to-50V_9-358835.pdf?src-supplier=Mouser, ComponentLink1URL=http://www.mouser.com/ds/2/447/Yageo_UPY-GP_NP0_16V-to-50V_9-358835.pdf?src-supplier=Mouser, ComponentLink2Description=https://datasheet.octopart.com/CC0603KRX7R8BB224-Yageo-datasheet-140260305.pdf?src-supplier=Newark, ComponentLink2URL=https://datasheet.octopart.com/CC0603KRX7R8BB224-Yageo-datasheet-140260305.pdf?src-supplier=Newark, ComponentLink3Description=https://datasheet.octopart.com/CC0603KRX7R8BB224-Yageo-datasheet-181968713.pdf?src-supplier=Element14, ComponentLink3URL=https://datasheet.octopart.com/CC0603KRX7R8BB224-Yageo-datasheet-181968713.pdf?src-supplier=Element14, ComponentLink4Description=https://datasheet.octopart.com/CC0603KRX7R8BB224-Yageo-datasheet-181968713.pdf?src-supplier=Newark, ComponentLink4URL=https://datasheet.octopart.com/CC0603KRX7R8BB224-Yageo-datasheet-181968713.pdf?src-supplier=Newark, ComponentLink5Description=https://datasheet.octopart.com/CC0603KRX7R8BB224-Yageo-datasheet-147453679.pdf?src-supplier=Farnell, ComponentLink5URL=https://datasheet.octopart.com/CC0603KRX7R8BB224-Yageo-datasheet-147453679.pdf?src-supplier=Farnell, ComponentLink6Description=https://datasheet.octopart.com/CC0603KRX7R8BB224-Yageo-datasheet-27626582.pdf?src-supplier=Future+Electronics, ComponentLink6URL=https://datasheet.octopart.com/CC0603KRX7R8BB224-Yageo-datasheet-27626582.pdf?src-supplier=Future+Electronics, ComponentLink7Description=http://www.yageo.com/documents/recent/UPY-GPHC_X7R_6.3V-to-50V_8.pdf?src-supplier=Avnet, ComponentLink7URL=http://www.yageo.com/documents/recent/UPY-GPHC_X7R_6.3V-to-50V_8.pdf?src-supplier=Avnet, ComponentLink8Description=http://www.yageo.com/documents/recent/UPY-GPHC_X7R_6.3V-to-50V_18.pdf?src-supplier=Digikey, ComponentLink8URL=http://www.yageo.com/documents/recent/UPY-GPHC_X7R_6.3V-to-50V_18.pdf?src-supplier=Digikey, ComponentLink9Description=https://datasheet.octopart.com/CC0603KRX7R8BB224-Yageo-datasheet-151948686.pdf?src-supplier=TME, ComponentLink9URL=https://datasheet.octopart.com/CC0603KRX7R8BB224-Yageo-datasheet-151948686.pdf?src-supplier=TME, Halogen Free=5694HalogenFree, Item Type=Capacitors, Lead Free=5697LeadFree, Manufacturer Part Number=CC0603KRX7R8BB224, Material=4241ConductorMaterial, Pins=2NUMBER, Pricing="1=0.13, 10=0.07, 50=0.0488, 100=0.0422, 500=0.03094, 1000=0.02743 (USD)", RoHS=Yes, Stock=76385, Supplier=Digikey
C18: library part CC0603JRX7R9BB221, "CAP CER 220PF 50V X7R 0603", LCSC Part Number=C327270, Manufacturer=Yageo, ComponentLink1Description=http://www.mouser.com/ds/2/447/Yageo_UPY-GP_NP0_16V-to-50V_9-358835.pdf?src-supplier=Mouser, ComponentLink1URL=http://www.mouser.com/ds/2/447/Yageo_UPY-GP_NP0_16V-to-50V_9-358835.pdf?src-supplier=Mouser, ComponentLink2Description=http://www.yageo.com/exep/pages/download/literatures/ProductSelectionGuide%202014_Final_2.pdf?src-supplier=Digikey, ComponentLink2URL=http://www.yageo.com/exep/pages/download/literatures/ProductSelectionGuide%202014_Final_2.pdf?src-supplier=Digikey, ComponentLink3Description=https://datasheet.octopart.com/CC0603JRX7R9BB221-Yageo-datasheet-137700085.pdf?src-supplier=Future+Electronics, ComponentLink3URL=https://datasheet.octopart.com/CC0603JRX7R9BB221-Yageo-datasheet-137700085.pdf?src-supplier=Future+Electronics, ComponentLink4Description=https://www.yageo.com/upload/media/product/productsearch/datasheet/mlcc/UPY-GPHC_X7R_6.3V-to-50V_18.pdf?src-supplier=Digikey, ComponentLink4URL=https://www.yageo.com/upload/media/product/productsearch/datasheet/mlcc/UPY-GPHC_X7R_6.3V-to-50V_18.pdf?src-supplier=Digikey, ComponentLink5Description=https://datasheet.octopart.com/CC0603JRX7R9BB221-Yageo-datasheet-151948686.pdf?src-supplier=Farnell, ComponentLink5URL=https://datasheet.octopart.com/CC0603JRX7R9BB221-Yageo-datasheet-151948686.pdf?src-supplier=Farnell, ComponentLink6Description=http://www.yageo.com/documents/recent/UPY-GPHC_X7R_6.3V-to-50V_8.pdf?src-supplier=Avnet, ComponentLink6URL=http://www.yageo.com/documents/recent/UPY-GPHC_X7R_6.3V-to-50V_8.pdf?src-supplier=Avnet, ComponentLink7Description=http://www.yageo.com/documents/recent/UPY-GPHC_X7R_6.3V-to-50V_8.pdf?src-supplier=Future+Electronics, ComponentLink7URL=http://www.yageo.com/documents/recent/UPY-GPHC_X7R_6.3V-to-50V_8.pdf?src-supplier=Future+Electronics, ComponentLink8Description=https://datasheet.octopart.com/CC0603JRX7R9BB221-Yageo-datasheet-147453679.pdf?src-supplier=Newark, ComponentLink8URL=https://datasheet.octopart.com/CC0603JRX7R9BB221-Yageo-datasheet-147453679.pdf?src-supplier=Newark, Item Type=Capacitors, Manufacturer Part Number=CC0603JRX7R9BB221, Pricing="4000=0.006, 16000=0.0058, 40000=0.0057, 100000=0.0055, 160000=0.0053 (USD)", RoHS=Yes, Stock=12000, Supplier="Future Electronics"
C19 C22 C25: library part GQM1875C2E510FB12D, "51 pF ±1% 250V Ceramic Capacitor C0G, NP0 0603 (1608 Metric)", LCSC Part Number=C17504198, Manufacturer=Murata, Item Type=Capacitors, Manufacturer Part Number=GQM1875C2E510FB12D, Pricing="1=0.58, 10=0.26, 50=0.26, 100=0.181, 1000=0.16, 10000=0.122 (USD)", RoHS=Yes, Stock=1634, Supplier=Mouser
C20 C21 C23 C24 C26 C27: library part CC1206KKX7RBBB223, "CAP CER 0.022UF 500V X7R 1206", LCSC Part Number=C326702, Manufacturer=Yageo, ComponentLink1Description=http://www.mouser.com/ds/2/447/Yageo_UPY-GP_NP0_16V-to-50V_9-358835.pdf?src-supplier=Mouser, ComponentLink1URL=http://www.mouser.com/ds/2/447/Yageo_UPY-GP_NP0_16V-to-50V_9-358835.pdf?src-supplier=Mouser, ComponentLink2Description=http://www.yageo.com/documents/recent/UPY-NP0X7R_MV_100-to-630V_9.pdf?src-supplier=Avnet, ComponentLink2URL=http://www.yageo.com/documents/recent/UPY-NP0X7R_MV_100-to-630V_9.pdf?src-supplier=Avnet, ComponentLink3Description=http://www.yageo.com/documents/recent/UPY-NP0X7R_MV_100-to-630V_19.pdf?src-supplier=Digikey, ComponentLink3URL=http://www.yageo.com/documents/recent/UPY-NP0X7R_MV_100-to-630V_19.pdf?src-supplier=Digikey, ComponentLink4Description=http://www.yageo.com/documents/recent/UPY-NP0X7R_MV_100-to-630V_21.pdf?src-supplier=Digikey, ComponentLink4URL=http://www.yageo.com/documents/recent/UPY-NP0X7R_MV_100-to-630V_21.pdf?src-supplier=Digikey, ComponentLink5Description=https://www.yageo.com/upload/media/product/products/datasheet/mlcc/UPY-NP0X7R_MV_100-to-630V_21.pdf?src-supplier=Digikey, ComponentLink5URL=https://www.yageo.com/upload/media/product/products/datasheet/mlcc/UPY-NP0X7R_MV_100-to-630V_21.pdf?src-supplier=Digikey, ComponentLink6Description=http://www.yageo.com/documents/recent/UPY-NP0X7R_MV_100-to-630V_9.pdf?src-supplier=Future+Electronics, ComponentLink6URL=http://www.yageo.com/documents/recent/UPY-NP0X7R_MV_100-to-630V_9.pdf?src-supplier=Future+Electronics, ComponentLink7Description=https://datasheet.octopart.com/CC1206KKX7RBBB223-Yageo-datasheet-10979222.pdf?src-supplier=Future+Electronics, ComponentLink7URL=https://datasheet.octopart.com/CC1206KKX7RBBB223-Yageo-datasheet-10979222.pdf?src-supplier=Future+Electronics, Item Type=Capacitors, Lead Free=5697LeadFree, Manufacturer Part Number=CC1206KKX7RBBB223, Pricing="3000=0.0421, 6000=0.0414, 12000=0.0407, 15000=0.0405, 45000=0.0392 (USD)", RoHS=Yes, Stock=660000, Supplier="Future Electronics"
D1: "DIODE SCHOTTKY 150V 20A TO2773", LCSC Part Number=C606024, Manufacturer="ON Semiconductor / Fairchild", ComponentLink1Description=http://www.farnell.com/datasheets/2552639.pdf?src-supplier=Farnell, ComponentLink1URL=http://www.farnell.com/datasheets/2552639.pdf?src-supplier=Farnell, ComponentLink2Description=https://www.onsemi.com/pub/Collateral/FSV20150V-D.PDF?src-supplier=Digikey, ComponentLink2URL=https://www.onsemi.com/pub/Collateral/FSV20150V-D.PDF?src-supplier=Digikey, ComponentLink3Description=https://www.fairchildsemi.com/datasheets/FS/FSV20150V.pdf?src-supplier=Digikey, ComponentLink3URL=https://www.fairchildsemi.com/datasheets/FS/FSV20150V.pdf?src-supplier=Digikey, ComponentLink4Description=http://www.farnell.com/datasheets/2552639.pdf?src-supplier=Newark, ComponentLink4URL=http://www.farnell.com/datasheets/2552639.pdf?src-supplier=Newark, Item Type=Diodes, Manufacturer Part Number=FSV20150V, Pricing="1=1.4397, 10=1.0081, 25=0.9981, 100=0.7548, 250=0.7285, 500=0.6712, 1000=0.6139, 3000=0.5566 (USD)", RoHS=Yes, Stock=3539, Supplier="Arrow Electronics"
D2: library part MMSZ5245B-7-F, "DIODE ZENER 15V 500MW SOD123", LCSC Part Number=C177050, Manufacturer=Diodes, Reverse Voltage=11V, ComponentLink1Description=https://datasheet.ciiva.com/15142/getdatasheetpartid-110401-15142750.pdf?src-supplier=Verical, ComponentLink1URL=https://datasheet.ciiva.com/15142/getdatasheetpartid-110401-15142750.pdf?src-supplier=Verical, ComponentLink2Description=https://datasheet.ciiva.com/890/ds18010-890775.pdf?src-supplier=Digikey, ComponentLink2URL=https://datasheet.ciiva.com/890/ds18010-890775.pdf?src-supplier=Digikey, ComponentLink3Description=https://datasheet.ciiva.com/890/ds18010-890776.pdf?src-supplier=Digikey, ComponentLink3URL=https://datasheet.ciiva.com/890/ds18010-890776.pdf?src-supplier=Digikey, ComponentLink4Description=https://datasheet.ciiva.com/890/ds18010-890777.pdf?src-supplier=Digikey, ComponentLink4URL=https://datasheet.ciiva.com/890/ds18010-890777.pdf?src-supplier=Digikey, ComponentLink5Description=https://datasheet.ciiva.com/8025/ds18010-8025783.pdf?src-supplier=Element14, ComponentLink5URL=https://datasheet.ciiva.com/8025/ds18010-8025783.pdf?src-supplier=Element14, Item Type=Diodes, Manufacturer Part Number=MMSZ5245B-7-F, Pricing="6000=0.0138 (USD)", RoHS=Yes, Stock=414000, Supplier="Arrow Electronics"
D3: "DIODE STANDARD 800V 1A SMA", Average Rectified Current=1A, Case/Package=SMA, Forward Voltage=1.7V, LCSC Part Number=C110532, Manufacturer=Diodes, Max Forward Surge Current (Ifsm)=30A, Max Operating Temperature=150°C, Max Repetitive Reverse Voltage (Vrrm)=800V, Max Reverse Current=5uA, Min Operating Temperature=-65°C, Package Quantity=5000, ComponentLink1Description=https://datasheet.ciiva.com/8053/ds16008-8053517.pdf?src-supplier=Element14, ComponentLink1URL=https://datasheet.ciiva.com/8053/ds16008-8053517.pdf?src-supplier=Element14, ComponentLink2Description=https://datasheet.ciiva.com/22695/1906610-22695291.pdf?src-supplier=Element14, ComponentLink2URL=https://datasheet.ciiva.com/22695/1906610-22695291.pdf?src-supplier=Element14, ComponentLink3Description=https://datasheet.ciiva.com/913/ds16008-913631.pdf?src-supplier=Digikey, ComponentLink3URL=https://datasheet.ciiva.com/913/ds16008-913631.pdf?src-supplier=Digikey, Forward Current=1A, Height=2.1mm, Item Type=Diodes, Length=4.6mm, Manufacturer Part Number=US1K-13-F, Max Reverse Voltage (DC)=800V, Max Surge Current=30A, Mounting Technology="Surface Mount", Packaging="Tape and Reel", Peak Non-Repetitive Surge Current=30A, Pins=2, Pricing="5000=0.0427, 10000=0.0422 (USD)", Radiation Hardening=No, Reach SVHC Compliant=No, Recovery Time=75ns, Reverse Recovery Time=75ns, Reverse Recovery Time-Max=75ns, Reverse Voltage (DC)=800V, RoHS=Yes, RoHS Compliant=Yes, Series=-, Stock=60000, Supplier="Arrow Electronics", Termination=SMD/SMT, Voltage Rating (DC)=800V, Weight=0.002258oz, Width=2.92mm
D4: "DIODE STANDARD 150V 1A SMA", Average Rectified Current=1A, Case/Package=SMA, Forward Voltage=920mV, LCSC Part Number=C781252, Manufacturer=Diodes, Max Operating Temperature=150°C, Max Repetitive Reverse Voltage (Vrrm)=150V, Max Reverse Current=5uA, Max Surge Current=30A, Min Operating Temperature=-55°C, Package Quantity=5000, ComponentLink1Description=https://datasheet.ciiva.com/914/ds14001-914688.pdf?src-supplier=Digikey, ComponentLink1URL=https://datasheet.ciiva.com/914/ds14001-914688.pdf?src-supplier=Digikey, ComponentLink2Description=https://datasheet.ciiva.com/8301/ds14001-8301646.pdf?src-supplier=Avnet, ComponentLink2URL=https://datasheet.ciiva.com/8301/ds14001-8301646.pdf?src-supplier=Avnet, ComponentLink3Description=https://datasheet.ciiva.com/914/ds14001-914689.pdf?src-supplier=Digikey, ComponentLink3URL=https://datasheet.ciiva.com/914/ds14001-914689.pdf?src-supplier=Digikey, Current Rating=1A, Forward Current=1A, Height=2.1mm, Item Type=Diodes, Lead Free="Lead Free", Length=4.6mm, Manufacturer Part Number=ES1C-13-F, Max Reverse Voltage (DC)=150V, Mounting Technology="Surface Mount", Output Current=1A, Packaging="Tape and Reel", Peak Non-Repetitive Surge Current=30A, Pins=2, Polarity=Standard, Pricing="614=0.1548 (USD)", Radiation Hardening=No, Recovery Time=25ns, Reverse Recovery Time=25ns, Reverse Recovery Time-Max=25ns, Reverse Voltage (DC)=150V, RoHS=Yes, RoHS Compliant=Yes, Series=-, Stock=614, Supplier="Arrow Electronics", Termination=SMD/SMT, Voltage Rating (DC)=150V, Weight=0.002258oz, Width=2.92mm
FB1 FB2 FB3 FB4: "FERRITE BEAD 1.5 KOHM 0805 1LN", Frequency=100MHz, LCSC Part Number=C413959, Manufacturer=Murata, RMS Current (Irms)=250mA, ComponentLink1Description=https://datasheet.ciiva.com/19454/1845267-19454720.pdf?src-supplier=Jameco, ComponentLink1URL=https://datasheet.ciiva.com/19454/1845267-19454720.pdf?src-supplier=Jameco, ComponentLink2Description=https://datasheet.ciiva.com/14122/amblm21b-data-e-14122891.pdf?src-supplier=Distrelec, ComponentLink2URL=https://datasheet.ciiva.com/14122/amblm21b-data-e-14122891.pdf?src-supplier=Distrelec, ComponentLink3Description=https://datasheet.ciiva.com/6211/l0110s0100blm21b-6211484.pdf?src-supplier=Digikey, ComponentLink3URL=https://datasheet.ciiva.com/6211/l0110s0100blm21b-6211484.pdf?src-supplier=Digikey, ComponentLink4Description=https://datasheet.ciiva.com/6211/l0110s0100blm21b-6211486.pdf?src-supplier=Digikey, ComponentLink4URL=https://datasheet.ciiva.com/6211/l0110s0100blm21b-6211486.pdf?src-supplier=Digikey, ComponentLink5Description=https://datasheet.ciiva.com/6211/l0110s0100blm21b-6211487.pdf?src-supplier=Digikey, ComponentLink5URL=https://datasheet.ciiva.com/6211/l0110s0100blm21b-6211487.pdf?src-supplier=Digikey, ComponentLink6Description=https://datasheet.ciiva.com/16420/l0110s0100blm21b-16420715.pdf?src-supplier=Future+Electronics, ComponentLink6URL=https://datasheet.ciiva.com/16420/l0110s0100blm21b-16420715.pdf?src-supplier=Future+Electronics, ComponentLink7Description=https://datasheet.ciiva.com/17277/l0110s0100blm21b-17277370.pdf?, ComponentLink7URL=https://datasheet.ciiva.com/17277/l0110s0100blm21b-17277370.pdf?, ESR=450mR, Item Type="Ferrite Beads", Lead Free=5697LeadFree, Manufacturer Part Number=BLM21BD152SN1D, Number of Circuits=1NUMBER, Pricing="1=0.21, 10=0.114, 50=0.114, 100=0.102, 1000=0.068, 10000=0.048 (USD)", RoHS=Yes, Shielding=202Shielding, Stock=31999, Supplier=Mouser
J1: "FUSE BLOK CARTRIDGE 125V 10A SMD", LCSC Part Number=C108518, Manufacturer=Littelfuse, ComponentLink1Description=https://datasheet.ciiva.com/3812/01550900m-3812998.pdf?src-supplier=Arrow+Electronics, ComponentLink1URL=https://datasheet.ciiva.com/3812/01550900m-3812998.pdf?src-supplier=Arrow+Electronics, Item Type="Fuse Holders", Lead Free=5697LeadFree, Manufacturer Part Number=01550900M, Pricing="1=2.5, 5=2.072, 10=1.912, 50=1.586, 100=1.4631, 250=1.31448, 500=1.21164, 1000=1.11633, 5000=1.06138 (USD)", Reach SVHC Compliant=4187SVHC, RoHS=Yes, Stock=4038, Supplier=Digikey
J2: "CONN HDR 24POS 0.1 GOLD PCB R/A", Color=Black, Manufacturer=Sullins, Package Quantity=1000, ComponentLink1Description=http://sullinscorp.com/catalogs/147_PAGE119_.100_SFH11_SERIES_FEMALE_HDR_ST_RA.pdf?src-supplier=Digikey, ComponentLink1URL=http://sullinscorp.com/catalogs/147_PAGE119_.100_SFH11_SERIES_FEMALE_HDR_ST_RA.pdf?src-supplier=Digikey, Connector Type=Header, Contact Plating=Gold, Contact Type="Female Socket", Item Type=Connectors, Manufacturer Part Number=SFH11-PBPC-D12-RA-BK, Mounting Technology="Through Hole", Number of Positions=24, Number of Rows=2, Packaging=Tray, Pitch=0.1inch, Pricing="1000=0.8853 (USD)", RoHS=Yes, RoHS Compliant=Yes, Row Spacing=0.1inch, Series=SFH11, Supplier=Digikey, Termination=Solder
J3: "320V 20A 4 Bend -40℃~+105℃ 1 5.08mm 1x4P Green Receptacle-Close Screw Fixing Push-Pull,P=5.08mm Pluggable System Terminal Block ROHS", LCSC Part Number=C395755, Manufacturer=DORABO, Package=Push-Pull,P=5.08mm, ComponentLink1Description=LCSC, ComponentLink1URL=https://www.lcsc.com/product-detail/Pluggable-System-Terminal-Block_DORABO-DB2ERM-5-08-4P-GN_C395755.html?s_z=n_DB2ERM-5.08-4P-GN, Item Type="Terminal Block", Manufacturer Part Number=DB2ERM-5.08-4P-GN
L1 L2 L3 L5 L6 L7: library part PK0810-471MB, "420mA 470uH EI-core Inductor ±20% Plugin Power Inductors ROHS", LCSC Part Number=C400319, Manufacturer="SXN(Shun Xiang Nuo Elec)", Package=Plugin, ComponentLink1Description=LCSC, ComponentLink1URL=https://www.lcsc.com/product-detail/Power-Inductors_SXN-Shun-Xiang-Nuo-Elec-PK0810-471MB_C400319.html, Item Type=Inductor, Manufacturer Part Number=PK0810-471MB
Q1: "900V 5.1A 83W 1.2Ω@10V,2.8A 3.5V 1 N-channel TO-252-3 MOSFETs ROHS", LCSC Part Number=C386347, Manufacturer=Infineon, ComponentLink1Description=https://www.verical.com/server-webapp/html/getDatasheet?partID=419979&src-supplier=Verical, ComponentLink1URL=https://www.verical.com/server-webapp/html/getDatasheet?partID=419979&src-supplier=Verical, ComponentLink2Description=https://datasheet.octopart.com/IPD90R1K2C3-Infineon-datasheet-7537246.pdf?src-supplier=Farnell, ComponentLink2URL=https://datasheet.octopart.com/IPD90R1K2C3-Infineon-datasheet-7537246.pdf?src-supplier=Farnell, ComponentLink3Description=https://datasheet.octopart.com/IPD90R1K2C3ATMA1-Infineon-datasheet-32982626.pdf?src-supplier=Future+Electronics, ComponentLink3URL=https://datasheet.octopart.com/IPD90R1K2C3ATMA1-Infineon-datasheet-32982626.pdf?src-supplier=Future+Electronics, Item Type=Mosfet, Manufacturer Part Number=IPD90R1K2C3, Pricing="1=1.96, 10=1.32, 50=1.32, 100=1.01, 1000=0.802, 10000=0.681 (USD)", RoHS=Yes, Supplier=Mouser